# Altium PCB HLK-RM08A-KIT-V2.5.PcbDoc
Units mm, origin at the board's own origin, x right, y up, seen from the top; angles counter-clockwise.
Board outline 90 x 99 mm, 2 copper layers (Top Layer, Bottom Layer); 69 components, 103 nets, 378 pads, 257 vias.
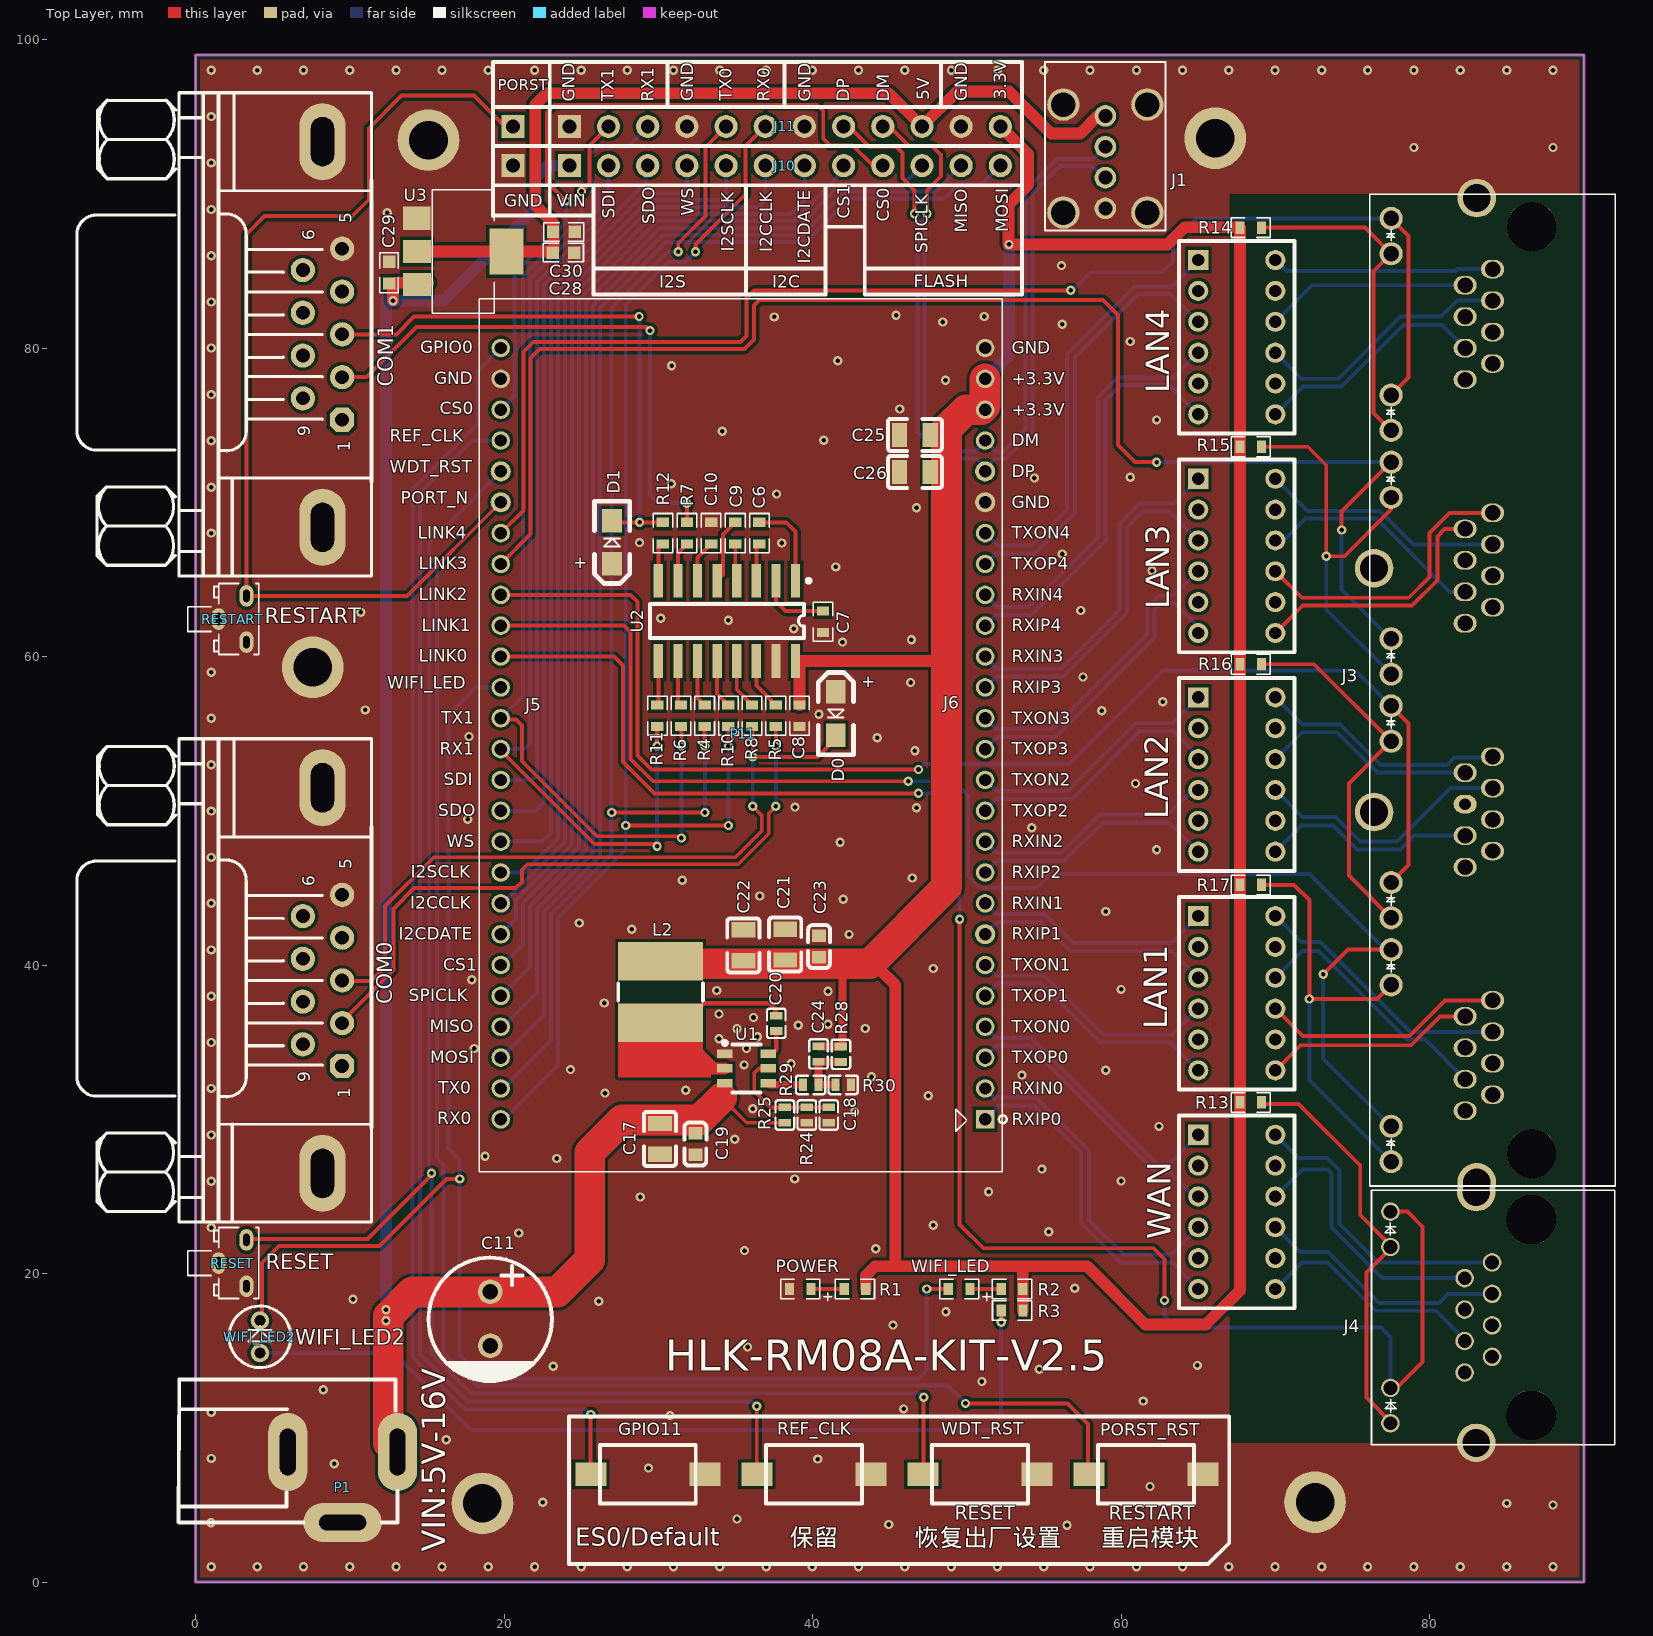
[diagram p0: Top Layer view]
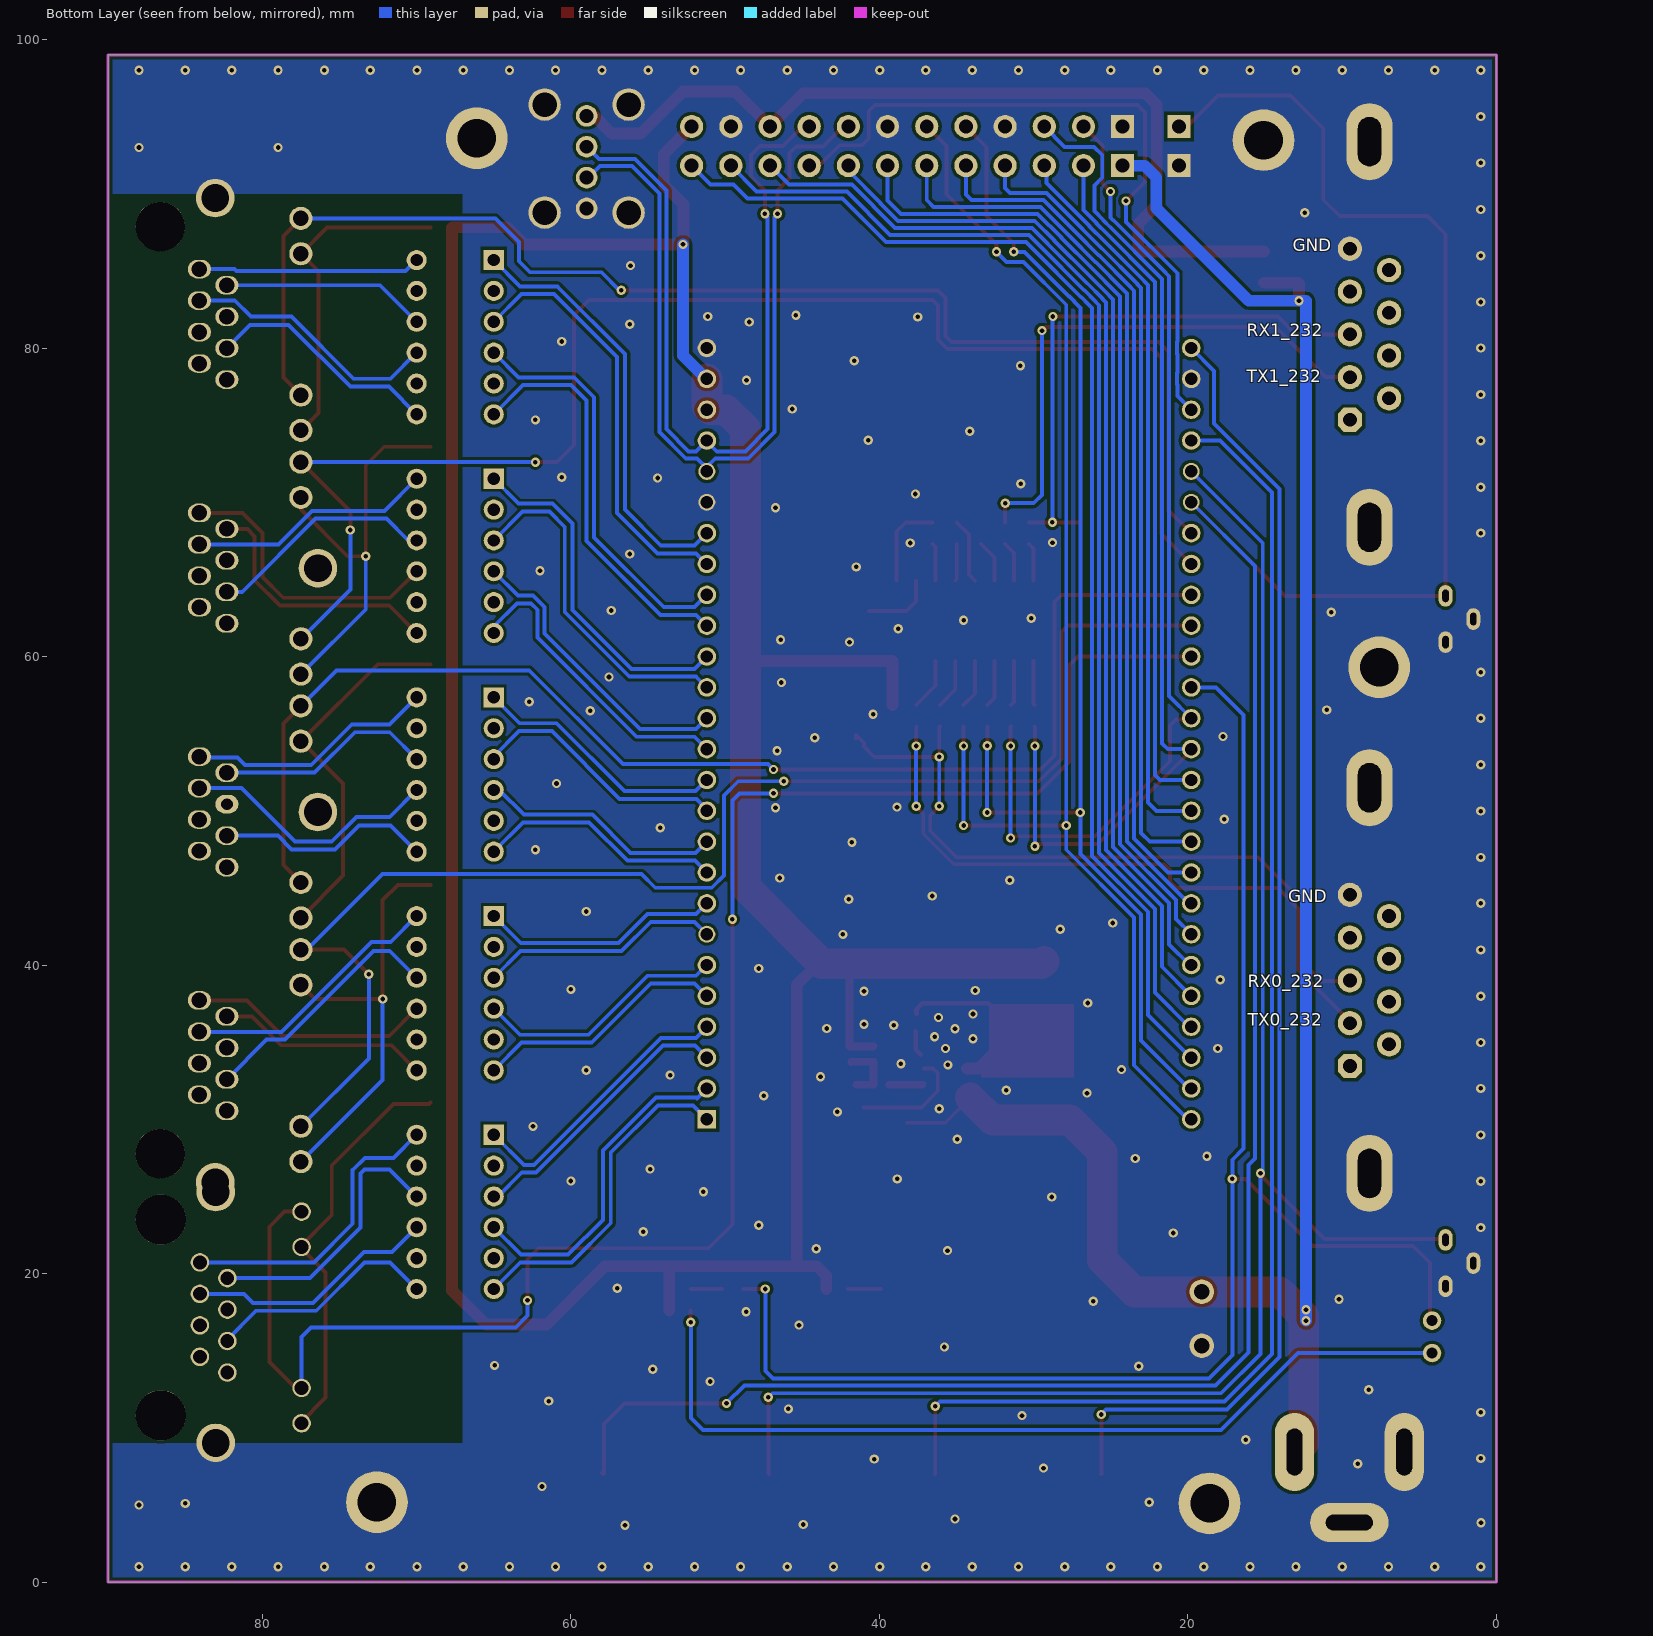
[diagram p1: Bottom Layer view, seen from below]

## Layer stack, top to bottom
Top Layer: signal copper 0.0356
Dielectric: dielectric 0.32, FR-4, Dk 4.8
Bottom Layer: signal copper 0.0356

## Board outline
0,0 90,0 90,99 0,99

## Design rules (kind name [scope] priority, off if disabled: settings)
Clearance keepout [All] p1: gap=0.2
Clearance router [InNet('GND')] p2: gap=0.2
PlaneConnect [All] p1: planeconnectstyle=Direct reliefexpansion=0.508 reliefentries=4 reliefconductorwidth=0.254 reliefairgap=0.254
PolygonConnect [All] p1: connectstyle=Direct reliefconductorwidth=0.254 reliefentries=4 polygonreliefangle="90 Angle"
RoomDefinition HLK-RM08A-KIT-V2.5 [InComponentClass('HLK-RM08A-KIT-V2.5')] p1: confinementstyle=ConfineIn formatcopy=TRUE lockcomponents=FALSE outline -44.961,-21.523 5.839,-21.523 5.839,3.877 -44.961,3.877
RoutingVias [All] p1: holewidth=0.4 width=0.8 viastyle="Through Hole" minholewidth=0.305 minwidth=0.711 maxholewidth=0.711 maxwidth=1.27
SilkscreenOverComponentPads [IsPad] p1: minsilkscreentomaskgap=0.254
SolderMaskExpansion [All] p1: expansion=0.102
TestPointUsage [All] p1: valid=0 allowmultiple=FALSE
Testpoint [(IsPad And (OnTopLayer Or OnBottomLayer))] p1: side=3 testpointundercomponent=TRUE minsize=1.016 maxsize=2.54 preferedsize=1.524 minholesize=0 maxholesize=1.016 preferedholesize=0.813 testpointgrid=0.025 style=297 order=0-112345678
Width [All] p1: maxlimit=3 minlimit=0.18 preferedwidth=0.2
22 further rules are at their usual default settings.

## Components (designator, comment, footprint, x,y, rotation, side; value= is the part's Value field where it differs from the comment)
C6 "0.1uF/6.3V" 0603#1 36.55,68.001 r90 top
C7 "0.1uF/6.3V" 0603#1 40.671,62.254 r270 top
C8 "0.1uF/6.3V" 0603#1 39.147,56.158 r270 top
C9 "0.1uF/6.3V" 0603#1 34.986,68.001 r270 top
C10 "0.1uF/6.3V" 0603#1 33.422,68.001 r270 top
C11 "470uF 25V" "1000uF 8*12 电解电容" 19.101,17.069 r270 top
C17 "10uF/25V" 0805 30.099,28.727 r90 top
C18 "NC" 0402 41.046,30.277 r90 top
C19 "0.1uF/25V" 0603#2 32.41,28.397 r90 top
C20 "1uF/25V" 0402 37.643,36.22 r270 top
C21 "22uF/6.3V" 0805 38.227,41.326 r270 top
C22 "22uF/6.3V" 0805 35.509,41.275 r270 top
C23 "0.1uF/6.3V" 0603#2 40.411,41.199 r270 top
C24 "NC" 0402 40.386,34.239 r270 top
C25 "22uF/6.3V" 0805 46.634,74.371 r0 top
C26 "22uF/6.3V" 0805 46.634,71.958 r0 top
C28 "0.1uF/6.3V" 0603#3 23.851,86.182 r0 top
C29 "22uF/25V" 0603#3 12.548,84.887 r90 top
C30 "10uF/6.3V" 0603#3 23.876,87.528 r0 top
COM0 "DB9" DB9s 9.5,44.551 r90 top
COM1 "DB9" DB9s 9.5,86.432 r90 top locked
D0 "ZMM5V1" 1005D 41.513,57.701 r270 top
D1 "ZMM5V1" 1005D 27,66 r90 top
GPIO11 "SW-PB" SWITCH 29.185,6.992 r180 top
J1 "USB" USB/4P/P2.0/DIP/R/F/SUA-110VB-B2N 58.979,95.047 r90 top
J3 "RJ45-4" RJ45-4-LED 82.3,46.35 r90 top
J4 "RJ45" RJ45-1-LED 84.048,20.725 r90 top
J10 "2.54*16" HDR1X12 24.232,91.821 r0 top
J11 "2.54*16" HDR1X12 24.232,94.361 r0 top
L2 "6.8uH" "4.7uH SMD,5.8x5.2x4.5mm" 30.15,38.252 r90 top
LAN1 "TF-1016DG" tf-1016dg 65,43.175 r270 top locked
LAN2 "TF-1016DG" tf-1016dg 65,57.35 r270 top locked
LAN3 "TF-1016DG" tf-1016dg 65,71.525 r270 top locked
LAN4 "TF-1016DG" tf-1016dg 65,85.7 r270 top locked
P1 "PWR2.5" POWER_STK1 9.534,8.941 r0 top locked
P11 "7688A" RM08K_52pin 51.186,30 r90 top locked
PORST_RST "SW-PB" SWITCH 61.471,6.992 r180 top
POWER "" 0603LED 39.2,19.001 r180 top
R1 "1K" 0603#1 42.745,19.001 r0 top
R2 "1K" 0603#1 52.931,19.001 r0 top
R3 "1K" 0603#1 52.934,17.602 r0 top
R4 "0R" 0603#1 33.007,56.158 r90 top
R5 "0R" 0603#1 37.612,56.158 r270 top
R6 "0R" 0603#1 31.472,56.158 r90 top
R7 "0R" 0603#1 31.858,68.001 r90 top
R8 "0R" 0603#1 36.077,56.158 r270 top
R10 "0R" 0603#1 34.542,56.158 r90 top
R11 "0R" 0603#1 29.937,56.158 r90 top
R12 "0R" 0603#1 30.293,68.001 r90 top
R13 "1K" 0603#1 68.4,31.1 r180 top
R14 "1K" 0603#1 68.4,87.8 r180 top
R15 "1K" 0603#1 68.4,73.6 r180 top
R16 "1K" 0603#1 68.4,59.5 r180 top
R17 "1K" 0603#1 68.4,45.2 r180 top
R24 "NC" 0402 39.624,30.277 r90 top
R25 "100K" 0402 38.202,30.277 r270 top
R28 "6.2K/1%" 0402 41.834,34.214 r90 top
R29 "1K" 0402 39.878,32.233 r0 top
R30 "2K/1%" 0402 41.986,32.233 r180 top
REF_CLK "SW-PB" SWITCH 39.947,6.992 r180 top
RESET "SW-PB" K5 1.5,20.682 r180 top
RESTART "SW-PB" K5 1.5,62.432 r180 top (schematic designator CS2)
U1 "MP1470" MP1470 35.712,33.299 r270 top
U2 "SP3232" MAX3232 29.495,63.778 r0 top
U3 "AMS1117-5" AMS1117 17.247,86.258 r270 top
WAN "TF-1016DG" tf-1016dg 65,29 r270 top locked
WDT_RST "SW-PB" SWITCH 50.709,6.992 r180 top
WIFI_LED "" 0603LED 49.5,19.001 r180 top
WIFI_LED2 "" LED0.2 4.175,14.85 r90 top

## Footprints (in the part's own frame and the unit in brackets; to place one, negate y for a bottom-side part, rotate by r counter-clockwise, add the part's x,y. Pads: shape width x height; smd on the part's side, far side on the other; paste and mask are expansions set on the pad)
"4.7uH SMD,5.8x5.2x4.5mm" [mm] "SMD,5.8x5.2x4.5mm"
  rect 2.5x5.5 smd: 1(-2,0) 2(2,0)
  silkscreen extent -0.55,-2.75 0.55,2.75
0402 [mm]
  rect 0.5x0.8 smd: 1(-0.5,0) 2(0.5,0)
  silkscreen extent -0.95,-0.6 0.95,0.6
0603#1 [mm]
  rect 0.6x0.8 smd: 1(-0.7,0) 2(0.7,0)
  silkscreen extent -1.27,-0.64 1.27,0.64
0603#2 [mm]
  rect 0.8x0.9 smd: 1(-0.7,0) 2(0.7,0)
  silkscreen extent -1.4,-0.7 1.4,0.72
0603#3 [mm]
  rect 0.8x0.8 smd: 1(-0.7,0) 2(0.7,0)
  silkscreen extent -1.3,-0.6 1.3,0.6
0603LED [mm]
  rect 0.6x0.8 smd: 1(-0.7,0) 2(0.7,0)
  silkscreen extent -2.03,-0.64 1.27,0.76
0805 [mm]
  rect 1x1.55 smd: 1(-1,0) 2(1,0)
  silkscreen extent -1.75,-1.04 1.75,1.04
"1000uF 8*12 电解电容" [mm]
  round 1.6 hole 1: 1(-1.75,0) 2(1.75,0)
  silkscreen extent -3.96,-4 4.04,4
1005D [mil]
  rect 60x50 smd: 1(0,0) 2(110,0)
  silkscreen extent -50,-45 160,45
AMS1117 [mm]
  rect 1.5x1.8 smd: 1(-2.153,-2.905) 2(0.003,-2.884) 3(2.153,-2.884)
  rect 3x2.2 smd: 2(0,2.905)
  silkscreen extent -4,-1.89 4,2.11
DB9s [mil]
  oval 196.85x118.11 hole 59.06 slot 125.98 at 0 deg: 0(273.33,50) 10(-710.83,50)
  oct 62x62 hole 35: 1(-436.67,0)
  round 62 hole 35: 2(-327.5,0) 5(0,0) 6(-54.17,100) 7(-163.33,100) 8(-272.5,100) 9(-381.67,100)
  round 62.01 hole 35: 3(-218.35,0) 4(-109.17,0)
  silkscreen extent -835,-75 398,677
HDR1X12 [mm] "Connector; Header; 16 Position"
  rect 1.5x1.5 hole 0.9: 1(0,0)
  round 1.5 hole 0.9: 2(2.54,0) 3(5.08,0) 4(7.62,0) 5(10.16,0) 6(12.7,0) 7(15.24,0) 8(17.78,0) 9(20.32,0) 10(22.86,0) 11(25.4,0) 12(27.94,0)
  silkscreen extent -1.27,-1.27 29.34,1.27
K5 [mm]
  oval 0.9x1.4 hole 0.4 slot 0.8 at 90 deg: 1(-1.8,1.5) 2(-1.8,-1.5) 3(0,0)
  silkscreen extent -2.6,-2.3 2,2.3
LED0.2 [mm]
  round 1.2 hole 0.7: 1(0,0) 2(2.1,0)
  silkscreen extent -0.95,-2 3.05,2
MAX3232 [mm]
  rect 0.6x2.2 smd: 1(9.398,1.136) 2(8.128,1.136) 3(6.858,1.136) 4(5.588,1.136) 5(4.318,1.136) 6(3.048,1.136) 7(1.778,1.136) 8(0.508,1.136) 9(0.508,-4.064) 10(1.778,-4.064) 11(3.048,-4.064) 12(4.318,-4.064) 13(5.588,-4.064) 14(6.858,-4.064) 15(8.128,-4.064) 16(9.398,-4.064)
  silkscreen extent -0.05,-2.56 10.37,1.26
MP1470 [mm]
  rect 0.55x1 smd: 1(-0.95,-1.4) 2(0,-1.4) 3(0.95,-1.4) 4(0.95,1.4) 5(0,1.4) 6(-0.95,1.4)
  silkscreen extent -1.78,-1.52 1.55,0.9
POWER_STK1 [mil]
  oval 100x200 hole 40 slot 120 at 90 deg: 1(-140,-20) 2(140,-20)
  oval 200x100 hole 40 slot 120 at 0 deg: 3(0,-200)
  silkscreen extent -418,-200 140,165
RJ45-1-LED [mm]
  round 2.5 hole 1.8: 0(4.56,1.02) 13(-11.7,1.02)
  round 1.2 hole 0.89: 1(0,0) 2(-1.02,1.78) 3(-2.04,0) 4(-3.06,1.78) 5(-4.08,0) 6(-5.1,1.78) 7(-6.12,0) 8(-7.14,1.78) 9(3.29,6.59) 10(1,6.59) 11(-8.14,6.59) 12(-10.43,6.59)
  round 3.25 hole 3.25: ""(-9.92,-2.54) ""(2.78,-2.54)
  silkscreen extent -11.81,-7.96 4.67,7.82
RJ45-4-LED [mm]
  round 2.5 hole 1.8: 0(43.37,-0.76) 49(-20.43,-0.76) ""(3.57,5.902) ""(19.37,5.902)
  round 1.5 hole 1: 1(42.051,4.797) 2(39.761,4.797) 11(30.6,4.8) 12(28.31,4.8) 13(26.251,4.797) 14(23.961,4.797) 23(14.8,4.8) 24(12.51,4.8) 25(10.451,4.797) 26(8.161,4.797) 35(-1,4.8) 36(-3.29,4.8) 37(-5.349,4.797) 38(-7.639,4.797) 47(-16.8,4.8) 48(-19.09,4.8)
  oval 1.2x1.5 hole 1: 3(38.761,-1.778) 4(37.72,0) 5(36.721,-1.778) 6(35.68,0) 7(34.681,-1.778) 8(33.64,0) 9(32.641,-1.778) 10(31.6,0) 15(22.961,-1.778) 16(21.92,0) 17(20.921,-1.778) 18(19.88,0) 19(18.881,-1.778) 20(17.84,0) 21(16.841,-1.778) 22(15.8,0) 27(7.161,-1.778) 28(6.12,0) 29(5.121,-1.778) 31(3.081,-1.778) 32(2.04,0) 33(1.041,-1.778) 34(0,0) 39(-8.639,-1.778) 40(-9.68,0) 41(-10.679,-1.778) 42(-11.72,0) 43(-12.719,-1.778) 44(-13.76,0) 45(-14.759,-1.778) 46(-15.8,0)
  oval 1.2x1.5 hole 0.762: 30(4.08,0)
  round 3.2 hole 3.2: ""(-18.58,-4.32) ""(41.52,-4.32)
  silkscreen extent -20.67,-9.72 43.61,6.18
RM08K_52pin [mm]
  rect 1.2x1.2 hole 0.8: 1(0,0)
  round 1.2 hole 0.8: 2(2,0) 3(4,0) 4(6,0) 5(8,0) 6(10,0) 8(14,0) 9(16,0) 10(18,0) 11(20,0) 12(22,0) 13(24,0) 14(26,0) 15(28,0) 16(30,0) 17(32,0) 18(34,0) 19(36,0) 20(38,0) 23(44,0) 24(46,0) 25(48,0) 26(50,0) 27(50,31.4) 28(48,31.4) 29(46,31.4) 30(44,31.4) 33(38,31.4) 34(36,31.4) 35(34,31.4) 36(32,31.4) 37(30,31.4) 38(28,31.4) 39(26,31.4) 40(24,31.4) 41(22,31.4) 42(20,31.4) 43(18,31.4) 44(16,31.4) 45(14,31.4) 46(12,31.4) 47(10,31.4) 48(8,31.4) 49(6,31.4) 50(4,31.4) 51(2,31.4) 52(0,31.4)
  round 1.3 / inner round 1.1 / far side round 1.1 hole 0.8: 7(12,0) 22(42,0)
  round 1.3 / inner round 1.3 / far side round 1.1 hole 0.8: 21(40,0) 31(42,31.4) 32(40,31.4)
  silkscreen extent -3.4,-1.4 53.2,32.8
SWITCH [mm]
  rect 2x1.5 smd: 1(-3.844,0) 2(3.556,0)
  silkscreen extent -3.24,-1.9 2.96,1.9
tf-1016dg [mm]
  rect 1.3x1.3 hole 0.8: 1(0,0)
  round 1.3 hole 0.8: 2(2,0) 3(4,0) 4(6,0) 5(8,0) 6(10,0) 7(10,5) 8(8,5) 9(6,5) 10(4,5) 11(2,5) 12(0,5)
  silkscreen extent -1.25,-1.25 11.25,6.25
USB/4P/P2.0/DIP/R/F/SUA-110VB-B2N [mm]
  round 1.4 hole 0.9: 1(0,0) 2(-2,0) 3(-4,0) 4(-6,0)
  round 2.1 hole 1.6: 5(0.73,2.72) 6(0.73,-2.72) 7(-6.27,2.72) 8(-6.27,-2.72)
  silkscreen extent -7.44,-3.9 3.51,3.9

## Part data
C6 C7 C8 C9 C10: library part Cap, "Capacitor"
C11: library part "1000uF 8*12 电解电容"
C17 C21 C22 C25 C26: library part C0805
C18 C20 C24: library part C0402
C19 C23: library part C0603
C28 C29 C30: library part CAP, "Capacitor"
D0 D1: library part Diode, "Default Diode"
GPIO11 PORST_RST REF_CLK RESET RESTART WDT_RST: "Switch"
J1: library part 2
J4: library part RJ45_1
J10 J11: library part CON16, "Connector"
L2: library part INDUCTOR1
LAN1 LAN2 LAN3 LAN4 P11 WAN: library part Component_1
P1: "Low Voltage Power Supply Connector"
POWER WIFI_LED WIFI_LED2: library part LED
R1 R2 R3 R13 R14 R15 R16 R17: library part Res1, "Resistor"
R4 R5 R6 R7 R8 R10 R11 R12: library part Res2, "Resistor"
R24 R25 R28 R29 R30: library part R0402
U2: library part MAX232ACPE, "+5V Powered, Multi-Channel RS-232 Driver/Receiver"
U3: library part AMS1117-3.3

## Free pads (board coordinates)
  round 4 hole 2.5: 0(7.6,59.3) 1(15.1,93.474) 1(66.1,93.6) 2(72.573,5.182) 3(18.6,5.1)
  rect 1.5x1.5 hole 0.9: 0.9(20.574,91.821) 0.9(20.574,94.361)

## Via types
v1: diameter 0.6, hole 0.3, Top Layer to Bottom Layer, tented both sides, 257 vias

## Nets (pads, with @x,y where several pads share a name; then routed paths per layer and width w, separated by ;. In a path a pad name is that pad's centre, name@x,y a point inside that pad or via, vN(x,y) a via of type N, cw(c..) or ccw(c..) an arc to the next point about the centre after c; other vN are vias at no path point)
+3.3V: C8.1 C21.2 C22.2 C23.2 C24.1 C25.2 C26.2 J11.12 L2.2 P11.24 P11.25 R1.2 R2.2 R3.2 R13.2 R14.2 R15.2 R16.2 R17.2 R28.2 U2.16 | length 230.3
  Top Layer w0.5: C24.1 40.411,34.714 R28.2 ; R28.2@41.935,34.714 41.935,40.081
  Top Layer w0.762: C8.1 39.147,59.714 48.692,59.714 ; R1.2 43.445,19.873 44.046,20.475 47.168,20.475 ; 44.272,39.802 45.364,38.71 45.364,20.475 53.6,20.475 ; J11.12 53.975,92.558 53.975,90.576 52.705,89.306 52.705,86.716 v1(52.73,86.716) 63.017,86.716 64.135,87.833 67.667,87.833 R14.2 R15.2 R16.2 R17.2 R13.2 67.7,18.9 65.5,16.7 61.575,16.7 57.8,20.475 53.6,20.475 ; R3.2@53.631,17.602 R2.2 53.631,20.444 53.6,20.475
  Top Layer w2: L2.2@29.337,40.227 29.482,40.081 43.714,40.081 48.692,45.06 48.692,74.752 49.936,75.997 50.952,75.997 51.186,76.231 P11.25
  Bottom Layer w0.762: P11.25 51.228,78 52.73,79.502 v1(52.73,86.716)
+5: C28.1 C30.1 J1.1 J11.10 U3.2 | length 58.8
  Top Layer w0.762: U3.2@15.074,86.256 23.122,86.256 23.227,86.36 23.227,87.757 23.227,88.051 22.022,89.256 22.022,95.783 22.758,96.52 44.933,96.52 J11.10 49.352,96.622 52.756,96.622 55.474,93.904 57.353,93.904 58.496,95.047 J1.1
+12V_IN: C11.1 C17.2 C19.2 C29.1 J10.1 P1.2 R25.2 U1.3 U3.3 | length 131.6
  Top Layer w0.254: 34.112,31.394 35.73,29.777 R25.2
  Top Layer w0.762: v1(12.8,83.058) 12.8,84.16 12.827,84.187 12.873,84.233 U3.3@15.074,84.233
  Top Layer w2: P1.2 12.497,9.026 12.497,17.247 14.046,18.796 23.47,18.796 25.552,20.879 25.552,27.864 27.646,29.958 32.676,29.958 34.112,31.394
  Bottom Layer w0.762: v1(12.344,16.942) v1(12.344,17.653) 12.344,83.058 v1(12.8,83.058) 16.053,83.058 22.047,89.052 22.047,91.059 22.809,91.821 J10.1
CS0: J10.9 P11.29 | length 46.2
  Top Layer w0.254: v1(24.014,89.535) 22.784,90.765 22.784,95.275 23.266,95.758 40.284,95.758 40.691,95.352 40.691,93.574 41.123,93.142 42.596,93.142 43.917,91.821 J10.9
  Bottom Layer w0.254: P11.29 20.686,76.9 20.686,77.589 20.713,77.616 20.713,78.384 20.686,78.411 20.686,79.589 20.713,79.616 20.713,80.384 20.686,80.411 20.686,84.847 24.014,88.174 v1(24.014,89.535)
CS1: J10.8 P11.47 | length 66.3
  Bottom Layer w0.254: P11.47 19.883,40 21.225,41.342 21.225,44.019 24.851,47.644 24.851,83.148 25.076,83.373 25.076,83.387 26.341,84.652 26.355,84.652 28.651,86.948 28.651,86.963 29.931,88.243 38.796,88.243 39.926,89.372 39.926,89.405 42.012,91.491 J10.8
DM: J1.2 J11.9 P11.23 | length 52.9
  Top Layer w0.254: J11.9 44.983,94.361 46.253,93.091 47.752,93.091 48.336,92.507 48.336,91.135 47.422,90.221 v1(47.422,88.697)
  Bottom Layer w0.254: v1(47.422,88.697) 47.249,88.524 47.249,74.747 48.692,73.304 50.546,73.304 51.186,73.945 P11.23 51.882,73.304 52.368,73.304 53.8,74.737 53.8,90.206 55.844,92.25 58.182,92.25 J1.2
DP: J1.3 J11.8 P11.22 | length 53.7
  Top Layer w0.254: J11.8 42.367,94.361 43.663,93.066 45.39,93.066 45.822,92.634 45.822,91.008 46.609,90.221 v1(46.609,88.697)
  Bottom Layer w0.254: v1(46.609,88.697) 46.795,88.511 46.795,74.559 48.504,72.85 50.644,72.85 51.186,72.309 51.186,72.217 51.819,72.85 52.556,72.85 54.254,74.549 54.254,90.018 56.032,91.796 58.12,91.796 58.869,91.047 J1.3
GND: C7.2 C8.2 C10.1 C11.2 C17.1 C18.1 C19.1 C21.1 C22.1 C23.1 C25.1 C26.1 C28.2 C29.2 C30.2 COM0.0 COM0.5 COM0.10 COM1.0 COM1.5 COM1.10 D0.1 D1.1 GPIO11.1 J1.4 J1.5 J1.6 J1.7 J1.8 J3.0 J4.13 J11.1 J11.4 J11.7 J11.11 P1.1 P1.3 P11.21 P11.26 P11.28 pad.0 pad.0.9@20.574,91.821 pad.1 pad.2 pad.3 PORST_RST.1 POWER.2 R24.1 R30.1 REF_CLK.1 RESET.1 RESET.3 RESTART.1 RESTART.3 U1.1 U2.15 U3.1 WDT_RST.1
  other v1: 1.02,1 4,1 7,1 10,1 13,1 15.98,1 18.98,1 21.98,1 25.003,1 27.983,1 30.983,1 33.983,1 37,1 39.98,1 42.98,1 45.98,1 49,1 51.98,1 54.98,1 57.98,1 61,1 63.98,1 66.98,1 69.98,1 73,1 75.98,1 78.98,1 81.98,1 85,1 88,1 56.49,3.683 44.933,3.734 1,3.855 35.103,4.089 88,5 85,5.1 22.504,5.182 61.874,6.198 29.362,7.391 8.992,7.671 40.335,7.976 1.02,8.02 16.256,9.22 30.759,10.795 1.02,11 45.898,11.227 61.443,11.735 8.28,12.471 50.978,13.005 54.686,13.792 23.19,13.995 64.948,14.046 35.789,15.24 45.212,16.662 48.641,17.526 26.137,18.212 10.211,18.339 56.998,19.05 35.585,21.488 44.094,21.615 20.955,22.631 55.309,22.705 1.02,22.98 47.828,23.139 28.829,24.968 51.41,25.298 1.02,25.98 60,26 38.837,26.137 54.864,26.772 23.419,27.457 18.771,27.61 34.95,28.702 1.02,28.98 62.459,29.54 42.723,30.48 36.119,30.683 47.498,31.521 26.543,31.699 31.775,31.877 1.02,32.003 43.815,32.766 53.569,32.868 59,33.175 24.308,33.223 35.56,33.528 38.608,33.604 18.059,34.595 35.712,34.595 1.02,34.983 33.934,35.23 36.424,35.357 35.103,35.865 43.409,35.89 39.065,36.093 40.996,36.17 36.17,36.601 33.934,36.83 26.492,37.541 1.02,37.983 40.996,38.303 33.782,38.354 60,38.422 17.907,39.04 47.828,39.776 1.02,40.983 42.367,41.986 28.27,42.316 24.867,42.723 59,43.472 1.02,44 41.986,44.272 36.576,44.475 31.547,45.491 46.457,45.644 1.02,46.98 62.301,47.472 41.783,47.955 54.204,48.895 17.653,49.454 1.02,49.98 46.736,50.19 38.862,50.241 60.935,51.765 1.02,52.98 46.634,53.899 44.196,54.737 17.729,54.813 1.02,56 40.411,56.261 58.75,56.49 11,56.539 62.7,57.066 46.355,58.318 57.531,58.674 1.02,58.98 41.935,60.935 46.406,61.087 38.786,61.798 34.544,62.357 30.15,62.484 10.713,62.876 57.388,62.984 62.001,65.557 41.504,65.811 56.185,66.65 37.998,67.361 28.778,67.386 1.02,68 46.736,69.647 37.668,70.536 1.02,70.98 30.836,71.196 54.381,71.577 60.6,71.62 1.02,73.98 40.716,74.016 34.138,74.6 62.301,75.34 45.644,76.048 1.02,76.98 48.616,77.902 30.861,78.842 41.631,79.172 1.02,80 60.6,80.422 56.185,81.534 48.438,81.686 37.516,82.017 51.13,82.042 45.415,82.118 1.02,82.98 56.134,85.344 1.02,85.98 12.434,88.766 1.02,88.98 1.02,92 78.98,93 88,93 1.02,95 1.02,98 4,98 7,98 10,98 13,98 15.98,98 18.98,98 21.98,98 25.003,98 27.983,98 30.983,98 33.983,98 37,98 39.98,98 42.98,98 45.98,98 49,98 51.98,98 54.98,98 57.98,98 61,98 63.98,98 66.98,98 69.98,98 73,98 75.98,98 78.98,98 81.98,98 85,98 88,98
GPIO: GPIO11.2 P11.27 | length 84.8
  Top Layer w0.254: v1(25.613,10.864) 25.613,7.008 GPIO11.2
  Bottom Layer w0.254: P11.27 18.298,78.512 18.298,75.098 14.055,70.855 14.055,14.596 17.475,11.176 25.324,11.176 25.613,10.887 v1@25.613,10.836
I2CCLK: J10.6 P11.45 | length 59.1
  Bottom Layer w0.254: P11.45 19.922,44 23.943,48.021 23.943,83.524 24.168,83.749 24.168,83.763 25.965,85.56 25.979,85.56 27.743,87.324 27.743,87.339 29.555,89.151 36.5,89.151 36.932,89.583 J10.6
I2CDATE: J10.7 P11.46 | length 63.2
  Bottom Layer w0.254: P11.46 20.771,42.985 20.771,44.207 24.397,47.833 24.397,83.336 24.622,83.561 24.622,83.575 26.153,85.106 26.167,85.106 28.197,87.136 28.197,87.151 29.743,88.697 38.608,88.697 39.472,89.56 J10.7
I2SCLK: J10.5 P11.44 | length 55.7
  Bottom Layer w0.254: P11.44 21.28,46 23.489,48.209 23.489,83.712 23.714,83.937 23.714,83.951 25.777,86.014 25.791,86.014 27.289,87.512 27.289,87.527 29.367,89.605 34.036,89.605 34.392,89.96 34.392,91.364 34.163,91.592 J10.5
L0: J4.10 J4.12 R13.1 | length 27
  Top Layer w0.254: R13.1 69.2,31 71.5,31 75.5,27 75.5,23.785 77.56,21.725 75.895,20.06 75.895,11.96 J4.12@77.56,10.295
L1: J3.38 J3.48 R17.1 | length 28.3
  Top Layer w0.254: R17.1 71.217,45.2 72.2,44.217 v1(72.2,37.8) 76.592,37.8 J3.38
  Bottom Layer w0.254: v1(72.2,37.8) 72.2,32.56 J3.48
L2: J3.26 J3.36 R16.1 | length 24.2
  Top Layer w0.254: R16.1 72.514,59.5 J3.26 74.767,51.775 74.767,45.793 J3.36
L3: J3.14 J3.24 R15.1 | length 26.2
  Top Layer w0.254: R15.1 72.1,73.6 73.3,72.4 v1(73.3,66.5) 74.475,66.5 77.503,69.528 J3.14
  Bottom Layer w0.254: v1(73.3,66.5) 73.3,63.06 J3.24
L4: J3.2 J3.12 R14.1 | length 21.5
  Top Layer w0.254: R14.1 75.814,87.8 J3.2 76.369,84.977 76.369,75.791 J3.12
LINK0: J4.9 J4.11 P11.37 | length 115
  Top Layer w0.254: P11.37 27.122,60 27.711,59.411 27.711,53.162 29.743,51.13 v1(46.863,51.13) ; v1(49.53,42.977) 49.53,23.19 51.079,21.641 62.103,21.641 62.814,20.93 v1(62.814,18.263) ; J4.11@77.56,12.585 77.846,12.585 79.541,14.28 79.541,23.034 78.56,24.015 J4.9@77.56,24.015
  Bottom Layer w0.254: v1(46.863,51.13) 49.073,51.13 49.53,50.673 v1(49.53,42.977) ; v1(62.814,18.263) 62.814,17.272 63.576,16.51 76.835,16.51 77.458,15.887 J4.11
LINK1: J3.37 J3.47 P11.36 | length 91.8
  Top Layer w0.254: P11.36 27.789,62 28.194,61.595 28.194,53.365 29.642,51.918 v1(46.203,51.918) ; v1(73.1,39.4) 74.701,41.001 J3.37
  Bottom Layer w0.254: v1(46.203,51.918) 49.149,51.918 50.063,51.003 50.063,45.812 50.866,45.009 54.534,45.009 55.425,45.9 72.218,45.9 77.117,41.001 J3.37 ; v1(73.1,39.4) 73.1,33.95 J3.47
LINK2: J3.25 J3.35 P11.35 | length 84.2
  Top Layer w0.254: P11.35 28.202,64 28.651,63.551 28.651,53.594 29.566,52.68 v1(46.863,52.68) ; J3.35 78.634,46.484 78.634,55.67 J3.25
  Bottom Layer w0.254: v1(46.863,52.68) 47.219,53.035 56.635,53.035 62.7,59.1 75.204,59.1 J3.25
LINK3: J3.13 J3.23 P11.34 | length 96.2
  Top Layer w0.254: P11.34 21.717,67.931 21.717,79.35 22.301,79.934 35.585,79.934 36.195,80.543 36.195,82.753 36.551,83.109 58.826,83.109 59.792,82.144 59.792,73.711 60.901,72.601 v1(62.301,72.601) ; v1(74.3,68.2) 74.3,69.398 J3.13
  Bottom Layer w0.254: v1(62.301,72.601) J3.13 ; v1(74.3,68.2) 74.3,64.35 J3.23
LINK4: J3.1 J3.11 P11.33 | length 86.8
  Top Layer w0.254: P11.33 21.26,69.474 21.26,79.756 21.895,80.391 35.331,80.391 35.717,80.777 35.717,83.241 36.213,83.736 v1(56.728,83.736) ; J3.11 78.634,78.084 78.634,87.27 J3.1
  Bottom Layer w0.254: v1(56.728,83.736) 56.838,83.736 58.014,84.912 62.662,84.912 63.373,85.623 63.373,86.877 64.897,88.401 J3.1
MISO: J10.11 P11.49 | length 76.9
  Bottom Layer w0.254: P11.49 19.922,36 22.133,38.211 22.133,43.643 25.759,47.268 25.759,82.772 25.984,82.997 25.984,83.011 26.717,83.744 26.731,83.744 29.559,86.572 29.559,86.587 30.307,87.335 39.303,87.335 42.113,90.145 47.955,90.145 J10.11@49.606,91.796
MOSI: J10.12 P11.50 | length 81
  Bottom Layer w0.254: P11.50 19.827,34 22.587,36.76 22.587,43.455 26.213,47.08 26.213,82.584 26.438,82.809 26.438,82.823 26.905,83.29 26.919,83.29 30.013,86.384 30.013,86.399 30.495,86.881 39.586,86.881 42.396,89.691 48.543,89.691 49.454,90.602 50.952,90.602 J10.12@52.146,91.796
NetC6_1: C6.1 U2.3 | length 2.5
  Top Layer w0.254: U2.3 36.353,67.103 C6.1
NetC6_2: C6.2 U2.1 | length 5.8
  Top Layer w0.254: C6.2 38.294,68.701 38.893,68.102 U2.1
NetC7_1: C7.1 U2.2 | length 4.6
  Top Layer w0.254: U2.2 37.623,63.573 38.242,62.954 C7.1
NetC9_1: C9.1 U2.5 | length 4.3
  Top Layer w0.254: U2.5 34.205,65.306 34.205,67.92 C9.1
NetC9_2: C9.2 U2.4 | length 2.4
  Top Layer w0.254: C9.2 34.986,65.011 U2.4
NetC10_2: C10.2 U2.6 | length 2.8
  Top Layer w0.254: U2.6 32.543,66.422 C10.2
NetC18_2: C18.2 R24.2 R25.1 U1.5 | length 7.4
  Top Layer w0.254: U1.5 36.525,33.299 36.22,32.995 36.22,31.826 37.27,30.777 R25.1 R24.2 C18.2
NetC20_1: C20.1 L2.1 U1.2 | length 16.2
  Top Layer w0.3: L2.1@29.337,36.227 30.131,36.227 30.632,36.728 32.156,36.728 32.944,37.516 37.211,37.516 37.592,37.135 C20.1@37.592,36.822
  Top Layer w0.8: L2.1@28.55,36.252 30.6,36.252 33.553,33.299 U1.2
NetC20_2: C20.2 U1.6 | length 1.7
  Top Layer w0.3: U1.6@37.313,34.188 37.643,34.519 C20.2
NetC24_2: C24.2 R28.1 R29.2 R30.2 | length 4.1
  Top Layer w0.3: R28.1@41.816,33.696 R28.1
  Top Layer w0.5: R30.2 R29.2 40.386,32.24 C24.2 41.808,33.739 R28.1
NetJ3_3: J3.3 LAN4.12 | length 14.4
  Bottom Layer w0.254: LAN4.12 70.72,84.98 81.673,84.98 81.804,85.111 J3.3
NetJ3_4: J3.4 LAN4.10 | length 13.3
  Bottom Layer w0.254: LAN4.10 72.37,84.07 J3.4
NetJ3_5: J3.5 LAN4.9 | length 16.9
  Bottom Layer w0.254: LAN4.9 71.692,78.008 74.09,78.008 78.112,82.03 80.747,82.03 81.788,83.071 J3.5
NetJ3_8: J3.8 LAN4.7 | length 15.3
  Bottom Layer w0.254: LAN4.7 71.8,77.5 74.3,77.5 78.3,81.5 80.79,81.5 J3.8
NetJ3_15: J3.15 LAN3.9 | length 18.7
  Top Layer w0.254: LAN3.9 71.717,63.808 78.647,63.808 79.992,65.153 79.992,68.004 81.299,69.311 J3.15
NetJ3_16: J3.16 LAN3.7 | length 16.8
  Top Layer w0.254: LAN3.7 71.775,63.3 78.857,63.3 80.5,64.943 80.5,67.794 80.976,68.27 J3.16
NetJ3_17: J3.17 LAN3.12 | length 15.8
  Bottom Layer w0.254: LAN3.12 72.08,69.445 76.77,69.445 78.944,67.271 J3.17
NetJ3_20: J3.20 LAN3.10 | length 14.9
  Bottom Layer w0.254: LAN3.10 70.542,67.525 71.954,68.937 76.56,68.937 81.307,64.19 J3.20
NetJ3_27: J3.27 LAN2.12 | length 16.1
  Bottom Layer w0.254: LAN2.12 71.75,55.6 74.208,55.6 76.83,52.978 81.128,52.978 81.601,53.451 84.018,53.451 J3.27
NetJ3_28: J3.28 LAN2.10 | length 14.1
  Bottom Layer w0.254: LAN2.10 71.742,55.092 73.998,55.092 76.62,52.47 J3.28
NetJ3_29: J3.29 LAN2.9 | length 16.9
  Bottom Layer w0.254: LAN2.9 71.742,49.608 73.892,49.608 75.5,48 77.892,48 81.363,51.471 J3.29
NetJ3_32: J3.32 LAN2.7 | length 14
  Bottom Layer w0.254: LAN2.7 71.684,49.034 73.748,49.034 75.29,47.492 78.102,47.492 79,48.39 J3.32
NetJ3_39: J3.39 LAN1.9 | length 15.8
  Top Layer w0.254: LAN1.9 71.775,35.4 78.682,35.4 80.993,37.711 J3.39
NetJ3_40: J3.40 LAN1.7 | length 13.7
  Top Layer w0.254: LAN1.7 71.625,34.8 78.8,34.8 80.67,36.67 J3.40
NetJ3_41: J3.41 LAN1.12 | length 17.2
  Bottom Layer w0.254: LAN1.12 71.675,41.5 72.918,41.5 78.747,35.671 J3.41
NetJ3_44: J3.44 LAN1.10 | length 16.5
  Bottom Layer w0.254: LAN1.10 71.742,40.917 72.783,40.917 78.537,35.163 79.727,35.163 J3.44
NetJ4_1: J4.1 WAN.12 | length 19.6
  Bottom Layer w0.254: WAN.12 71.5,27.5 73.35,27.5 74.144,26.707 74.144,23.24 76.659,20.725 J4.1@84.15,20.725
NetJ4_2: J4.2 WAN.10 | length 18.1
  Bottom Layer w0.254: WAN.10 71.752,26.752 73.379,26.752 73.636,26.496 73.636,22.98 76.911,19.705 J4.2@82.37,19.705
NetJ4_3: J4.3 WAN.9 | length 16.4
  Bottom Layer w0.254: WAN.9 71.6,21.4 73.418,21.4 76.718,18.1 80.6,18.1 81.185,18.685 J4.3@84.15,18.685
NetJ4_6: J4.6 WAN.7 | length 15.2
  Bottom Layer w0.254: WAN.7 71.725,20.725 73.375,20.725 76.508,17.592 80.403,17.592 J4.6@82.37,15.625
NETL: J3.49 J4.0
NetPOWER_1: POWER.1 R1.1 | length 2.1
  Top Layer w0.254: POWER.1 R1.1
NetR2_1: R2.1 WIFI_LED.1 | length 2
  Top Layer w0.254: WIFI_LED.1 R2.1
NetR3_1: R3.1 WIFI_LED2.1 | length 57.4
  Top Layer w0.254: v1(52.222,16.84) 52.234,16.851 R3.1
  Bottom Layer w0.254: WIFI_LED2.1 12.861,14.85 17.856,9.855 51.435,9.855 52.222,10.643 v1(52.222,16.84)
NetR4_2: R4.2 U2.11 | length 3
  Top Layer w0.254: U2.11 32.543,57.322 R4.2
NetR5_1: R5.1 U2.14 | length 3.4
  Top Layer w0.254: U2.14 36.353,58.117 R5.1
NetR6_2: R6.2 U2.10 | length 2.9
  Top Layer w0.254: U2.10 31.273,57.057 R6.2
NetR7_1: R7.1 U2.7 | length 2.6
  Top Layer w0.254: U2.7 31.273,66.716 R7.1
NetR8_1: R8.1 U2.13 | length 3.3
  Top Layer w0.254: U2.13 35.083,57.852 R8.1
NetR10_2: R10.2 U2.12 | length 3.2
  Top Layer w0.254: U2.12 33.813,57.587 R10.2
NetR11_2: R11.2 U2.9 | length 2.9
  Top Layer w0.254: R11.2 30.003,56.924 U2.9
NetR12_1: R12.1 U2.8 | length 2.5
  Top Layer w0.254: U2.8 30.003,67.01 R12.1
NetR29_1: R29.1 U1.4 | length 2.3
  Top Layer w0.3: U1.4 U1.4@37.229,32.233
  Top Layer w0.5: U1.4@37.229,32.233 R29.1
PORST_RST: P11.32 pad.0.9@20.574,94.361 PORST_RST.2 RESTART.2 | length 170.6
  Top Layer w0.254: P11.32 13.718,63.932 RESTART.2 3.3,87.374 4.47,88.544 10.16,88.544 11.227,89.611 11.227,94.234 13.36,96.368 18.059,96.368 pad.0.9@20.066,94.361 ; v1(49.911,11.582) 56.515,11.582 57.861,10.236 57.861,7.045 PORST_RST.2 PORST_RST.2@57.998,7.075
  Bottom Layer w0.254: P11.32 15.656,65.87 15.656,27.473 16.078,27.051 16.078,14.884 18.212,12.751 48.757,12.751 v1@49.911,11.597
REF_CLK: P11.30 REF_CLK.2 | length 90.1
  Top Layer w0.254: v1(36.382,11.395) 36.382,7 REF_CLK.2
  Bottom Layer w0.254: P11.30 17.919,74 14.563,70.645 14.563,14.774 17.628,11.709 36.068,11.709 v1(36.382,11.395)
RX0: J11.6 P11.52 R10.1 | length 85.3
  Top Layer w0.254: v1(27.889,49.047) v1(34.542,49.047) ; v1(32.41,86.233) 32.41,86.716 35.662,89.967 35.662,93.091 J11.6 ; v1(34.542,54.204) R10.1
  Bottom Layer w0.254: P11.52 19.992,30 23.495,33.503 23.495,43.078 27.889,47.473 v1(27.889,49.047) 27.889,82.804 30.658,85.573 31.75,85.573 v1(32.41,86.233) ; v1(34.542,49.047) v1(34.542,54.204)
RX0_232: COM0.3 D0.2 R8.2 | length 46.9
  Top Layer w0.254: COM0.3 9.542,38.964 11.379,38.964 12.294,39.878 12.294,43.815 15.465,46.987 34.991,46.987 36.703,48.699 36.703,49.708 v1(36.119,50.292) ; R8.2 36.119,55.416 v1(36.119,53.492) 40.335,53.492 41.005,54.162 41.005,54.399 D0.2 D0.2@41.513,54.67
  Bottom Layer w0.254: v1(36.119,50.292) v1(36.119,53.492)
RX1: J11.3 P11.40 R11.1 | length 67.3
  Top Layer w0.254: P11.40 19.786,53.915 25.847,47.854 29.778,47.854 29.931,47.701 v1(29.921,47.701) ; v1(29.921,54.204) 29.921,55.442 R11.1
  Bottom Layer w0.254: P11.40 21.31,54 21.673,54.363 21.673,84.464 21.898,84.689 21.898,84.704 25.024,87.83 25.039,87.83 25.473,88.264 25.473,88.279 26.064,88.871 26.064,90.547 25.552,91.059 25.552,92.507 26.086,93.04 27.991,93.04 J11.3 ; v1(29.921,47.701) 29.921,48.346 v1(29.921,54.204)
RX1_232: COM1.3 D1.2 R12.2 | length 36.4
  Top Layer w0.254: COM1.3 13.017,80.886 14.161,82.03 v1@28.753,82.03 ; D1.2 27.093,68.701 v1(28.788,68.701) R12.2
  Bottom Layer w0.254: v1(28.753,82.042) 28.778,82.017 28.778,68.71 v1(28.788,68.701)
RXIN0: P11.2 WAN.4 | length 21.7
  Bottom Layer w0.254: P11.2 51.827,31.359 51.876,31.408 54.495,31.408 57.925,27.978 57.925,23.475 60.175,21.225 63.225,21.225 WAN.4
RXIN1: LAN1.1 P11.8 | length 15.6
  Bottom Layer w0.254: P11.8 51.878,43.308 55.035,43.308 56.918,41.425 63.25,41.425 LAN1.1
RXIN2: LAN2.4 P11.10 | length 15.8
  Bottom Layer w0.254: P11.10 51.911,47.275 56.132,47.275 58.607,49.75 63.052,49.75 64.652,51.35 LAN2.4
RXIN3: LAN3.1 P11.16 | length 22.5
  Bottom Layer w0.254: P11.16 51.986,59.2 56.069,59.2 59.892,63.023 59.892,68.61 61.19,69.908 63.383,69.908 LAN3.1
RXIN4: LAN4.4 P11.18 | length 26.3
  Bottom Layer w0.254: P11.18 51.986,63.2 53.982,63.2 58.492,67.71 58.492,76.81 59.782,78.1 63.4,78.1 LAN4.4
RXIP0: P11.1 WAN.6 | length 21.8
  Bottom Layer w0.254: P11.1 52.086,30.9 54.361,30.9 57.417,27.844 57.417,23.265 59.965,20.717 63.283,20.717 WAN.6
RXIP1: LAN1.3 P11.7 | length 15.6
  Bottom Layer w0.254: P11.7 51.986,42.8 54.825,42.8 56.708,40.917 63.258,40.917 LAN1.3
RXIP2: LAN2.6 P11.9 | length 15.9
  Bottom Layer w0.254: P11.9 51.953,46.767 56.342,46.767 58.817,49.242 63.108,49.242 LAN2.6
RXIP3: LAN3.3 P11.15 | length 22.5
  Bottom Layer w0.254: P11.15 51.878,58.692 56.203,58.692 60.4,62.889 60.4,68.4 61.4,69.4 63.125,69.4 LAN3.3
RXIP4: LAN4.6 P11.17 | length 26.4
  Bottom Layer w0.254: P11.17 51.878,62.692 54.192,62.692 59,67.5 59,76.6 59.992,77.592 63.108,77.592 LAN4.6
SDI: J10.2 P11.41 | length 43.9
  Bottom Layer w0.254: P11.41 21.819,52 22.127,52.308 22.127,84.276 22.352,84.501 22.352,84.516 25.212,87.376 25.227,87.376 25.927,88.076 25.927,88.091 26.772,88.936 J10.2
SDO: J10.3 P11.42 | length 47.1
  Bottom Layer w0.254: P11.42 22.035,50 22.581,50.546 22.581,84.088 22.806,84.313 22.806,84.328 25.4,86.922 25.415,86.922 26.381,87.888 26.381,87.903 29.168,90.69 29.168,91.677 J10.3
SPICLK: J10.10 P11.48 | length 72.7
  Bottom Layer w0.254: P11.48 19.788,38 21.679,39.891 21.679,43.831 25.305,47.456 25.305,82.96 25.53,83.185 25.53,83.199 26.529,84.198 26.543,84.198 29.105,86.76 29.105,86.775 30.119,87.789 38.984,87.789 40.38,89.184 40.38,89.217 41.765,90.602 45.872,90.602 J10.10@47.066,91.796
TX0: J11.5 P11.51 R4.1 | length 80.6
  Top Layer w0.254: v1(26.975,49.886) v1(33.02,49.886) ; v1(31.293,86.233) 31.293,86.792 33.045,88.544 33.045,93.015 J11.5 ; v1@32.969,54.178 v1(33.007,54.216) R4.1
  Bottom Layer w0.254: P11.51 19.986,32.2 20.135,32.2 23.041,35.106 23.041,43.266 26.975,47.2 v1(26.975,49.886) 26.975,82.601 27.352,82.978 27.352,83.026 27.667,83.341 27.715,83.341 30.607,86.233 v1(31.293,86.233) ; v1(33.007,54.216) 33.013,54.209 33.013,49.892 v1(33.02,49.886)
TX0_232: COM0.2 R5.2 | length 42.7
  Top Layer w0.254: COM0.2 9.5,36.348 12.827,39.675 12.827,43.637 14.173,44.983 20.752,44.983 21.158,45.39 21.158,46.177 21.514,46.533 35.179,46.533 37.16,48.514 37.16,49.835 v1(37.617,50.292) ; R5.2 37.612,54.846 37.617,54.84 v1(37.617,54.204)
  Bottom Layer w0.254: v1(37.617,50.292) v1(37.617,54.204)
TX1: J11.2 P11.39 R6.1 | length 64.8
  Top Layer w0.254: P11.39 19.871,55.915 20.767,55.915 21.158,55.524 21.158,53.213 26.023,48.348 31.382,48.348 v1(31.496,48.235) ; v1(25.019,90.145) 25.527,90.653 25.527,93.116 J11.2 ; R6.1 31.496,55.434 v1(31.496,54.204)
  Bottom Layer w0.254: P11.39 21.219,57.433 21.219,84.652 21.444,84.877 21.444,84.892 24.836,88.284 24.851,88.284 25.019,88.452 v1(25.019,90.145) ; v1(31.496,48.235) v1(31.496,54.204)
TX1_232: COM1.2 R7.2 | length 35.9
  Top Layer w0.254: COM1.2 11.082,78.113 14.326,81.356 29.213,81.356 v1@29.464,81.105 ; v1(31.836,69.944) 31.858,69.922 R7.2
  Bottom Layer w0.254: v1(29.464,81.128) 29.464,70.474 29.994,69.944 v1(31.836,69.944)
TXON0: P11.4 WAN.1 | length 18.3
  Bottom Layer w0.254: P11.4 51.903,35.283 54.157,35.283 62.39,27.05 63.05,27.05 WAN.1
TXON1: LAN1.4 P11.6 | length 16.4
  Bottom Layer w0.254: P11.6 51.878,39.308 55.035,39.308 58.86,35.483 63.308,35.483 LAN1.4
TXON2: LAN2.1 P11.12 | length 16.6
  Bottom Layer w0.254: P11.12 51.911,51.275 56.533,51.275 60.933,55.675 63.325,55.675 LAN2.1
TXON3: LAN3.4 P11.14 | length 19.3
  Bottom Layer w0.254: P11.14 51.878,55.308 55.533,55.308 61.722,61.497 61.722,63.221 62.459,63.958 63.433,63.958 LAN3.4
TXON4: LAN4.1 P11.20 | length 27.7
  Bottom Layer w0.254: P11.20 51.986,67.2 54.175,67.2 56.5,69.525 56.5,79.618 60.882,84 63.3,84 LAN4.1
TXOP0: P11.3 WAN.3 | length 18.2
  Bottom Layer w0.254: P11.3 51.961,34.775 54.023,34.775 62.256,26.542 63.183,26.542 64.725,25 WAN.3
TXOP1: LAN1.6 P11.5 | length 16.5
  Bottom Layer w0.254: P11.5 51.986,38.8 54.825,38.8 58.65,34.975 63.2,34.975 LAN1.6
TXOP2: LAN2.3 P11.11 | length 16.9
  Bottom Layer w0.254: P11.11 51.186,50.086 51.867,50.767 56.838,50.767 61.238,55.167 63.358,55.167 65,53.525 LAN2.3
TXOP3: LAN3.6 P11.13 | length 19.8
  Bottom Layer w0.254: P11.13 51.986,54.8 55.743,54.8 62.176,61.233 62.176,63.033 62.593,63.45 63.5,63.45 65,61.95 LAN3.6
TXOP4: LAN4.3 P11.19 | length 27.7
  Bottom Layer w0.254: P11.19 51.878,66.692 54.385,66.692 57.008,69.315 57.008,79.408 61.092,83.492 63.208,83.492 LAN4.3
WDT_RST: P11.31 RESET.2 WDT_RST.2 | length 111.1
  Top Layer w0.254: RESET.2 3.366,22.247 11.147,22.247 15.3,26.4 v1(15.3,26.5) ; WDT_RST.2 47.203,7.042 v1(47.203,11.979)
  Bottom Layer w0.254: v1@15.3,26.496 v1(15.3,26.5) ; P11.31 15.148,67.362 15.148,26.652 v1(15.3,26.5) ; v1(47.203,11.979) 46.939,12.243 17.856,12.243 15.3,14.799 v1(15.3,26.5)
WIFI_LED: P11.38 WIFI_LED2.2 WIFI_LED.2 | length 102.6
  Top Layer w0.254: WIFI_LED2.2 4.319,17.094 4.319,20.702 5.41,21.793 9.525,21.793 11.913,21.793 16.256,26.137 v1(17.12,26.137) ; v1@47.401,19.001 WIFI_LED.2
  Bottom Layer w0.254: P11.38 18.19,58 16.392,56.203 16.392,28.108 17.12,27.381 v1(17.12,26.137) 17.12,14.732 18.647,13.205 46.911,13.205 47.396,13.691 v1@47.396,18.996
  other v1: 47.4,19
WS: J10.4 P11.43 | length 51.8
  Bottom Layer w0.254: P11.43 22.473,48 23.035,48.562 23.035,83.9 23.26,84.125 23.26,84.139 25.588,86.468 25.603,86.468 26.835,87.7 26.835,87.715 29.179,90.059 31.547,90.059 31.852,90.364 J10.4
pads on no net: COM0.1 COM0.4 COM0.6 COM0.7 COM0.8 COM0.9 COM1.1 COM1.4 COM1.6 COM1.7 COM1.8 COM1.9 J3. J3.6 J3.7 J3.9 J3.10 J3.18 J3.19 J3.21 J3.22 J3.30 J3.31 J3.33 J3.34 J3.42 J3.43 J3.45 J3.46 J4. J4.4 J4.5 J4.7 J4.8 LAN1.2 LAN1.5 LAN1.8 LAN1.11 LAN2.2 LAN2.5 LAN2.8 LAN2.11 LAN3.2 LAN3.5 LAN3.8 LAN3.11 LAN4.2 LAN4.5 LAN4.8 LAN4.11 WAN.2 WAN.5 WAN.8 WAN.11

## Polygon pours and split planes (outlines as drawn)
GND on Top Layer "Top Layer-No Net" (solid, pour order 1004): 0,99 90,99 90,90 67,90 67,9.045 66.98,9.025 67.005,9 90,9 90,0 0,0
GND on Bottom Layer "Top Layer-No Net" (solid, pour order 1003): 0,99 90,99 90,90 67,90 67,9.045 66.98,9.025 67.005,9 90,9 90,0 0,0

## Keep-outs
Keep-Out Layer:
  the board outline again, w0.203

## Other copper
Top Layer:
  rectangle net NetC20_1: 27.381,32.715 32.896,37.49
  rectangle net NetC20_1: 31.267,32.715 33.426,33.774
  pour cut-out: 27.203,41.123 27.203,36.398 27.178,36.373 27.534,36.017 32.715,36.017 33.122,36.424 33.122,41.097 33.071,41.148 27.229,41.148

## Silkscreen, mask and mechanical layers (free items; w line width, h text height)
Top Overlay:
  lines w0.102: 49.971,29.914 49.285,29.228 49.285,30.65 49.971,29.964
  lines w0.254: 19.279,93.091 22.962,93.091 ; 19.279,95.631 22.962,95.631 22.962,98.552 ; 22.962,90.551 22.962,88.621 22.987,88.595 ; 23.317,90.551 19.279,90.551 ; 25.806,85.141 40.843,85.141 ; 25.806,88.595 22.987,88.595 ; 25.806,90.551 25.806,83.464 40.843,83.464 40.843,90.551 ; 30.607,95.656 30.607,98.552 ; 35.687,83.49 35.687,90.551 ; 38.176,95.707 38.176,98.527 ; 40.945,87.859 43.383,87.859 ; 43.383,85.166 53.543,85.166 ; 43.383,90.551 43.383,83.464 53.569,83.464 53.569,90.551 ; 48.336,95.656 48.336,98.45 ; 53.569,95.631 53.569,98.552 30.607,98.552 ; 19.279,90.551 19.279,88.541 19.332,88.595 22.987,88.595 ; 19.279,90.551 19.279,98.552 22.962,98.552 ; 22.962,98.552 30.607,98.552 ; 24.206,1.168 65.642,1.168 67.01,2.536 67.01,10.736 24.206,10.736 24.206,1.168
  text "PORST" at 19.583,96.723 h0.7
  text "3.3V" at 52.553,96.088 h0.8 r90
  text "5V" at 47.549,96.063 h0.8 r90
  text "TX0" at 34.747,96.037 h0.8 r90
  text "TX1" at 27.102,95.987 h0.8 r90
  text "GND" at 32.258,95.987 h0.8 r90
  text "GND" at 50.013,95.987 h0.8 r90
  text "GND" at 24.587,95.961 h0.8 r90
  text "RX1" at 29.718,95.961 h0.8 r90
  text "RX0" at 37.236,95.961 h0.8 r90
  text "GND" at 39.878,95.961 h0.8 r90
  text "DP" at 42.393,95.961 h0.8 r90
  text "DM" at 44.958,95.961 h0.8 r90
  text "GND" at 20.015,89.154 h0.8
  text "VIN" at 23.419,89.154 h0.8
  text "WS" at 32.309,88.584 h0.8 r90
  text "SDI" at 27.178,88.371 h0.8 r90
  text "CS1" at 42.418,88.363 h0.8 r90
  text "CS0" at 44.983,88.173 h0.8 r90
  text "SDO" at 29.769,88.028 h0.8 r90
  text "MOSI" at 52.68,87.514 h0.8 r90
  text "MISO" at 50.013,87.48 h0.8 r90
  text "I2SCLK" at 34.874,86.234 h0.8 r90
  text "I2CCLK" at 37.389,86.2 h0.8 r90
  text "SPICLK" at 47.473,86.131 h0.8 r90
  text "I2CDATE" at 39.853,85.457 h0.8 r90
  text "FLASH" at 46.558,83.947 h0.8
  text "I2C" at 37.389,83.922 h0.8
  text "I2S" at 30.048,83.896 h0.8
  text "GPIO0" at 14.58,79.654 h0.8
  text "GND" at 52.9,79.625 h0.8
  text "GND" at 15.49,77.646 h0.8
  text "+3.3V" at 52.9,77.625 h0.8
  text "CS0" at 15.845,75.717 h0.8
  text "+3.3V" at 52.9,75.625 h0.8
  text "REF_CLK" at 12.603,73.913 h0.8
  text "DM" at 52.9,73.625 h0.8
  text "WDT_RST" at 12.584,71.913 h0.8
  text "DP" at 52.9,71.625 h0.8
  text "PORT_N" at 13.289,69.913 h0.8
  text "GND" at 52.9,69.625 h0.8
  text "LINK4" at 14.397,67.646 h0.8
  text "TXON4" at 52.9,67.625 h0.8
  text "+" at 24.5,65.72 h0.8
  text "LINK3" at 14.473,65.646 h0.8
  text "TXOP4" at 52.9,65.625 h0.8
  text "LINK2" at 14.473,63.646 h0.8
  text "RXIN4" at 52.9,63.625 h0.8
  text "RESTART" at 4.5,62.15 h1
  text "LINK1" at 14.664,61.646 h0.8
  text "RXIP4" at 52.9,61.625 h0.8
  text "LINK0" at 14.473,59.646 h0.8
  text "RXIN3" at 52.9,59.625 h0.8
  text "+" at 43.164,58 h0.8
  text "WIFI_LED" at 12.44,57.913 h0.8
  text "RXIP3" at 52.9,57.625 h0.8
  text "J6" at 48.463,56.617 h0.8
  text "J5" at 21.387,56.49 h0.8
  text "TX1" at 15.932,55.646 h0.8
  text "TXON3" at 52.9,55.625 h0.8
  text "RX1" at 15.829,53.646 h0.8
  text "TXOP3" at 52.9,53.625 h0.8
  text "SDI" at 16.077,51.646 h0.8
  text "TXON2" at 52.9,51.625 h0.8
  text "SDO" at 15.734,49.646 h0.8
  text "TXOP2" at 52.9,49.625 h0.8
  text "WS" at 16.29,47.646 h0.8
  text "RXIN2" at 52.9,47.625 h0.8
  text "I2SCLK" at 13.94,45.646 h0.8
  text "RXIP2" at 52.9,45.625 h0.8
  text "I2CCLK" at 13.906,43.646 h0.8
  text "RXIN1" at 52.9,43.625 h0.8
  text "I2CDATE" at 13.163,41.646 h0.8
  text "RXIP1" at 52.9,41.625 h0.8
  text "CS1" at 16.069,39.646 h0.8
  text "TXON1" at 52.9,39.625 h0.8
  text "SPICLK" at 13.837,37.646 h0.8
  text "TXOP1" at 52.9,37.625 h0.8
  text "MISO" at 15.186,35.646 h0.8
  text "TXON0" at 52.9,35.625 h0.8
  text "MOSI" at 15.22,33.646 h0.8
  text "TXOP0" at 52.9,33.625 h0.8
  text "TX0" at 15.742,31.646 h0.8
  text "RXIN0" at 52.9,31.625 h0.8
  text "RX0" at 15.656,29.685 h0.8
  text "RXIP0" at 52.9,29.625 h0.8
  text "RESET" at 4.547,20.295 h1
  text "WIFI_LED2" at 6.477,15.392 h1
  text "HLK-RM08A-KIT-V2.5" at 30.455,13.716 h2
  text "RESET" at 49.21,3.736 h1.52
  text "RESTART" at 59.21,3.736 h1.52
  text "ES0/Default" at 24.613,1.981 h2
  text "VIN:5V-16V" at 16.18,1.956 h1.52 r90
  text "保留" at 38.51,1.949 h2
  text "恢复出厂设置" at 46.61,1.951 h2
  text "重启模块" at 58.71,1.947 h2
Bottom Overlay:
  text "GND" at 13.202,86.265 h0.8
  text "RX1_232" at 16.202,80.765 h0.8
  text "TX1_232" at 16.202,77.765 h0.8
  text "GND" at 13.487,44.069 h0.8
  text "RX0_232" at 16.126,38.551 h0.8
  text "TX0_232" at 16.126,36.051 h0.8

## Text inside footprints (layer, text, board x,y; h text height)
COM0: Top Overlay "6" at 7.722,45.102 h0.8 r90; Top Overlay "1" at 10.045,31.38 h0.8 r90; Top Overlay "5" at 10.135,46.202 h0.8 r90; Top Overlay "9" at 7.428,32.396 h0.8 r90
COM1: Top Overlay "6" at 7.722,86.982 h0.8 r90; Top Overlay "1" at 10.045,73.261 h0.8 r90; Top Overlay "5" at 10.135,88.083 h0.8 r90; Top Overlay "9" at 7.428,74.277 h0.8 r90